# Altium PCB PCB1.PcbDoc
Units mil, origin at the board's own origin, x right, y up, seen from the top; angles counter-clockwise.
Board outline 6000 x 4000 mil, 2 copper layers (Top Layer, Bottom Layer); 10 components, 8 nets, 27 pads, 0 vias.
Unrouted connection lines stored in the file: 2.
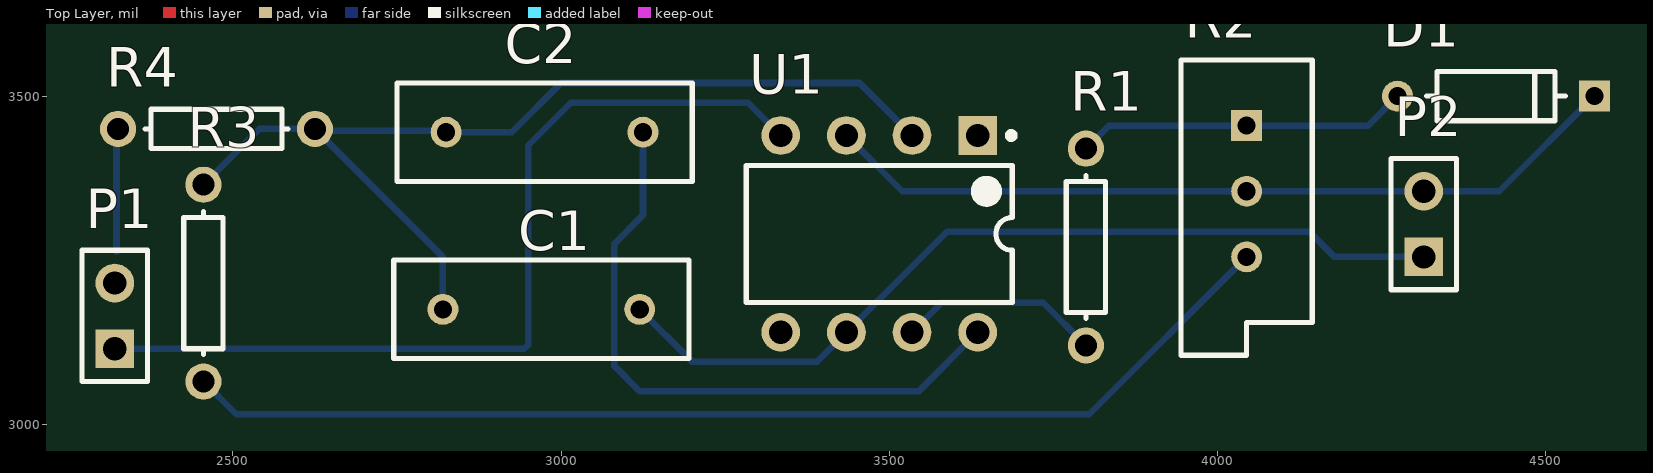
[diagram p0: Top Layer view]
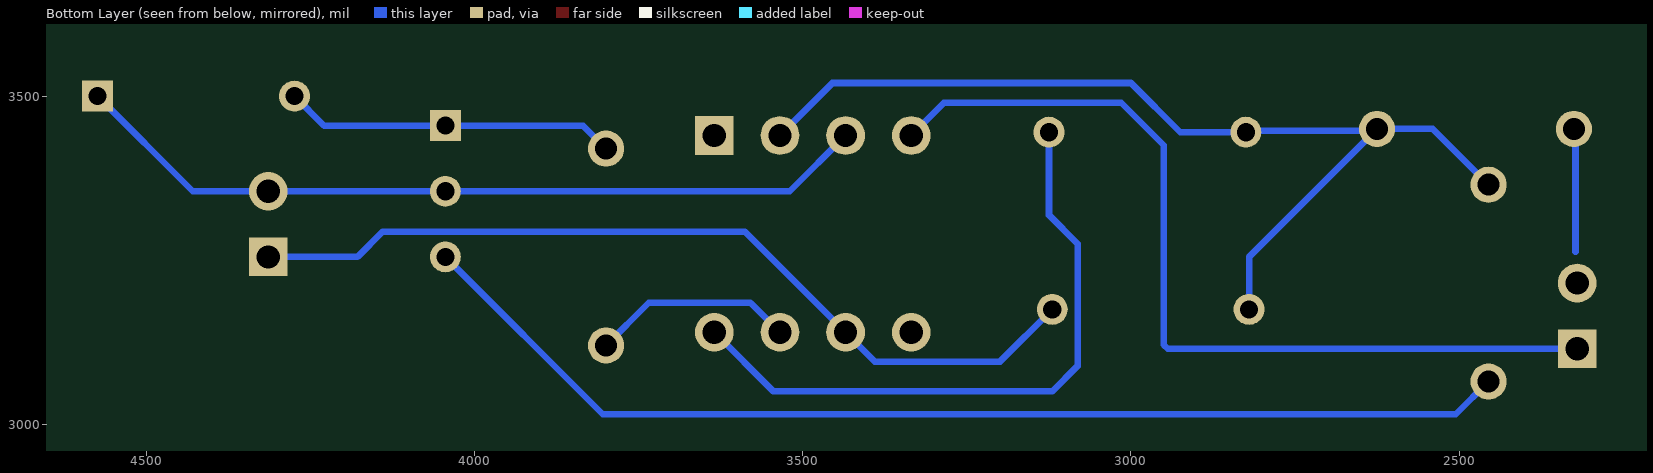
[diagram p1: Bottom Layer view, seen from below]

## Layer stack, top to bottom
Top Solder: solder mask 0.4, Solder Resist, Dk 3.5
Top Layer: signal copper 1.4
Dielectric 1: dielectric 12.6, FR-4, Dk 4.8
Bottom Layer: signal copper 1.4
Bottom Solder: solder mask 0.4, Solder Resist, Dk 3.5

## Board outline
1000,1000 7000,1000 7000,5000 1000,5000

## Design rules (kind name [scope] priority, off if disabled: settings)
Clearance [All] p1: gap=10 ignorepadtopadclearanceinfootprint=FALSE
PolygonConnect [All] p1: connectstyle=Relief reliefconductorwidth=10 reliefentries=4 polygonreliefangle="90 Angle" airgapwidth=10
RoutingVias [All] p1: holewidth=28 width=50 viastyle="Through Hole" minholewidth=28 minwidth=50 maxholewidth=28 maxwidth=50
SolderMaskExpansion [All] p1: expansion=0 istentingtop=FALSE
SupplyNets "Schematic Supply Nets_1" [InNet('GND')] p1: voltage=0.000
SupplyNets "Schematic Supply Nets" [InNet('VCC')] p2: voltage=0.000
Width [All] p1: maxlimit=10 minlimit=10 preferedwidth=10
30 further rules are at their usual default settings.

## Components (designator, comment, footprint, x,y, rotation, side; value= is the part's Value field where it differs from the comment)
C1 "Cap" RAD-0.3 2970,3175 r180 top value=100pF
C2 "Cap" RAD-0.3 2975,3445 r0 top value=100pF
D1 "1N457A" FP-017AG-MFG 4425,3500 r180 top
P1 "Header 2" HDR1X2 2320,3115 r90 top
P2 "Header 2" HDR1X2 4315,3255 r90 top
R1 "Res1" AXIAL-0.3 3800,3270 r90 top value=1K
R2 "RPot" VR5 4045,3355 r270 top value=1K
R3 "Res1" AXIAL-0.3 2455,3215 r90 top value=1K
R4 "Res1" AXIAL-0.3 2475,3450 r180 top value=1K
U1 "LM101AJ" NAB0008A 3485,3290 r270 top

## Footprints (in the part's own frame and the unit in brackets; to place one, negate y for a bottom-side part, rotate by r counter-clockwise, add the part's x,y. Pads: shape width x height; smd on the part's side, far side on the other; paste and mask are expansions set on the pad)
AXIAL-0.3 [mm] "Axial Device, Thru-Hole; 2 Leads; 0.3 in Pin Spacing"
  round 1.4 hole 0.85: 1(-3.81,0) 2(3.81,0)
  silkscreen extent -2.77,-0.76 2.77,0.76
FP-017AG-MFG [mm]
  rect 1.2x1.2 hole 0.7 paste-2539.97 mask+0: 1(-3.813,0)
  round 1.2 hole 0.7 paste-2539.97 mask+0: 2(3.813,0)
  silkscreen extent -2.68,-0.95 2.68,0.95, body extent -4.51,-1.05 4.51,1.05, height 0.25
HDR1X2 [mm] "Connector; Header; 2 Position"
  rect 1.5x1.5 hole 0.9: 1(0,0)
  round 1.5 hole 0.9: 2(2.54,0)
  silkscreen extent -1.27,-1.27 3.81,1.27
NAB0008A [mm] "DIP, 8-Leads, Body 9.78x6.73mm, Pitch 2.54mm, Row Spacing 7.62mm"
  rect 1.5x1.5 hole 0.9: 1(-3.81,3.81)
  round 1.5 hole 0.9: 2(-3.81,1.27) 3(-3.81,-1.27) 4(-3.81,-3.81) 5(3.81,-3.81) 6(3.81,-1.27) 7(3.81,1.27) 8(3.81,3.81)
  silkscreen extent -3.93,-5.15 2.65,5.24, body extent -3.6,-5.15 3.6,5.15, height 5.08
RAD-0.3 [mm] "Radial Cap, Thru-Hole; 2 Leads; 0.3 in Pin Spacing"
  round 1.2 hole 0.7: 1(-3.81,0) 2(3.81,0)
  silkscreen extent -5.71,-1.91 5.71,1.91
VR5 [mm] "Thru-Hole; 3 Leads"
  rect 1.2x1.2 hole 0.7: 1(-2.54,0)
  round 1.2 hole 0.7: 2(0,0) 3(2.54,0)
  silkscreen extent -5.08,-2.54 6.35,2.54

## Part data
C1 C2: "Capacitor", LatestRevisionDate=17-Jul-2002, LatestRevisionNote="Re-released for DXP Platform.", PackageDescription="Radial Cap, Thru-Hole; 2 Leads; 0.3 in Pin Spacing", PackageReference=RAD-0.3, Published=8-Jun-2000, Publisher="Altium Limited"
D1: library part CMP-00278-84323142-1, "1N457A Diode Standard Recovery Rectifier 70 Volt 0.2A 2-Pin DO-35 Bulk", Average Rectified Current=200mA, Capacitance=8pF, Case/Package=Axial, Current=2A, Forward Voltage=1V, Manufacturer Lifecycle Status=ACTIVE, Max Forward Surge Current (Ifsm)=1A, Max Junction Temperature (Tj)=175°C, Max Repetitive Reverse Voltage (Vrrm)=70V, Max Surge Current=4A, Min Operating Temperature=-65°C, Peak Reverse Current=25nA, Power Dissipation=500mW, Contact Plating=Tin, Current Rating=200mA, Element Configuration=Single, Forward Current=200mA, Height=1.91mm, Lead Free="Lead Free", Length=4.06mm, Lifecycle Status=Production, Max Operating Temperature=175°C, Max Reverse Voltage (DC)=70V, Mount="Through Hole", NexarPartId=84323142, Number of Pins=2, Output Current=200mA, Packaging=Bulk, Peak Non-Repetitive Surge Current=4A, Polarity=Standard, Radiation Hardening=No, REACH SVHC="No SVHC", Reverse Voltage=70V, RoHS=Compliant, Schedule B="8541100070, 8541100070|8541100070, 8541100070|8541100070|8541100070, 8541100070|8541100070|8541100070|8541100070", Termination=Axial, Voltage=70V, Voltage Rating (DC)=70V, Weight=4.535924g, Width=1.91mm
P1 P2: "Header, 2-Pin", LatestRevisionDate=17-Jul-2002, LatestRevisionNote="Re-released for DXP Platform.", Publisher="Altium Limited"
R1 R3 R4: "Resistor", LatestRevisionDate=17-Jul-2002, LatestRevisionNote="Re-released for DXP Platform.", PackageDescription="Axial Device, Thru-Hole; 2 Leads; 0.3 in Pin Spacing", PackageReference=AXIAL-0.3, Published=8-Jun-2000, Publisher="Altium Limited"
R2: "Potentiometer", LatestRevisionDate=17-Jul-2002, LatestRevisionNote="Re-released for DXP Platform.", PackageDescription="Variable Resistor, Thru-Hole; 3 Leads", PackageReference=VR5, Published=8-Jun-2000, Publisher="Altium Limited", Set Position=0.5, Sim Note="Enter the Resistance value and the set point into parameter fields."
U1: library part CMP-0055-00190-3, "Operational Amplifier, 8-pin CerDIP", Manufacturer="Texas Instruments", Package Reference=NAB0008A, PackageTopMarking=NSUZXYTT*LM101AJ, PowerWise=N, ComponentLink1Description="Datasheet URL", ComponentLink1URL=http://www.ti.com/general/docs/lit/getliterature.tsp?genericPartNumber=LM101A-N&fileType=pdf, CompType=Amplifiers, PackageDescription="Cerdip, .400 x .310in Body, 8 Lead, .300in Centers, .100in Pitch", PinCount=8, RoHS=N

## Nets (pads, with @x,y where several pads share a name; then routed paths per layer and width w, separated by ;. In a path a pad name is that pad's centre, name@x,y a point inside that pad or via, vN(x,y) a via of type N, cw(c..) or ccw(c..) an arc to the next point about the centre after c; other vN are vias at no path point)
GND: D1.1 P1.1 P2.2 R2.2 U1.3 U1.4 | length 2604.6
  Bottom Layer w10: P1.1 2944.14,3115 2950,3120.86 2950,3425 3015,3490 3285,3490 U1.4 ; U1.3 3520,3355 R2.2 P2.2 4430.12,3355 D1.1
NetC1_1: C1.1 P2.1 U1.6 | length 1326
  Bottom Layer w10: C1.1 3199.53,3095.47 3390.47,3095.47 U1.6 3588.62,3293.62 4140.43,3293.62 4179.05,3255 P2.1
NetC1_2: C1.2 C2.1 R3.2 R4.1 U1.2 | length 1537.3
  Bottom Layer w10: R3.2 2540,3450 R4.1 ; C1.2 2820,3255 R4.1 ; U1.2 3455,3520 3000,3520 2925,3445 C2.1 2822.5,3447.5 2627.5,3447.5 R4.1
NetC2_2: C2.2 U1.8 | length 981.3
  Bottom Layer w10: C2.2 3125,3318.77 3081.38,3275.15 3081.38,3088.62 3120,3050 3545,3050 U1.8
NetD1_2: D1.2 R1.2 R2.1 | length 508
  Bottom Layer w10: R1.2 3835,3455 R2.1 4229.88,3455 D1.2
NetP1_2: P1.2 R4.2 | length 192.1
  Bottom Layer w10: P1.2 P1.2@2322.5,3217.5 ; 2322.5,3262.5 2322.5,3447.5 R4.2
NetR2_3: R2.3 R3.1 | length 1710.1
  Bottom Layer w10: R3.1 2505,3015 3805,3015 R2.3
VCC: R1.1 U1.7 | length 310.6
  Bottom Layer w10: U1.7 3580,3185 3735,3185 R1.1
pads on no net: U1.1 U1.5